# Altium PCB NB3000XN.PcbDoc (part 25 of 71)
Units mil, origin at the board's own origin, x right, y up, seen from the top; angles counter-clockwise.
Board outline 9527.56 x 6929.77 mil, 6 copper layers (Top Layer, GND+SHIELD, MidLayer1, MidLayer2, P2 - 3V3+5V0, Bottom Layer), stack 62.375 mil thick; 832 components, 1027 nets, 4655 pads, 4981 vias.
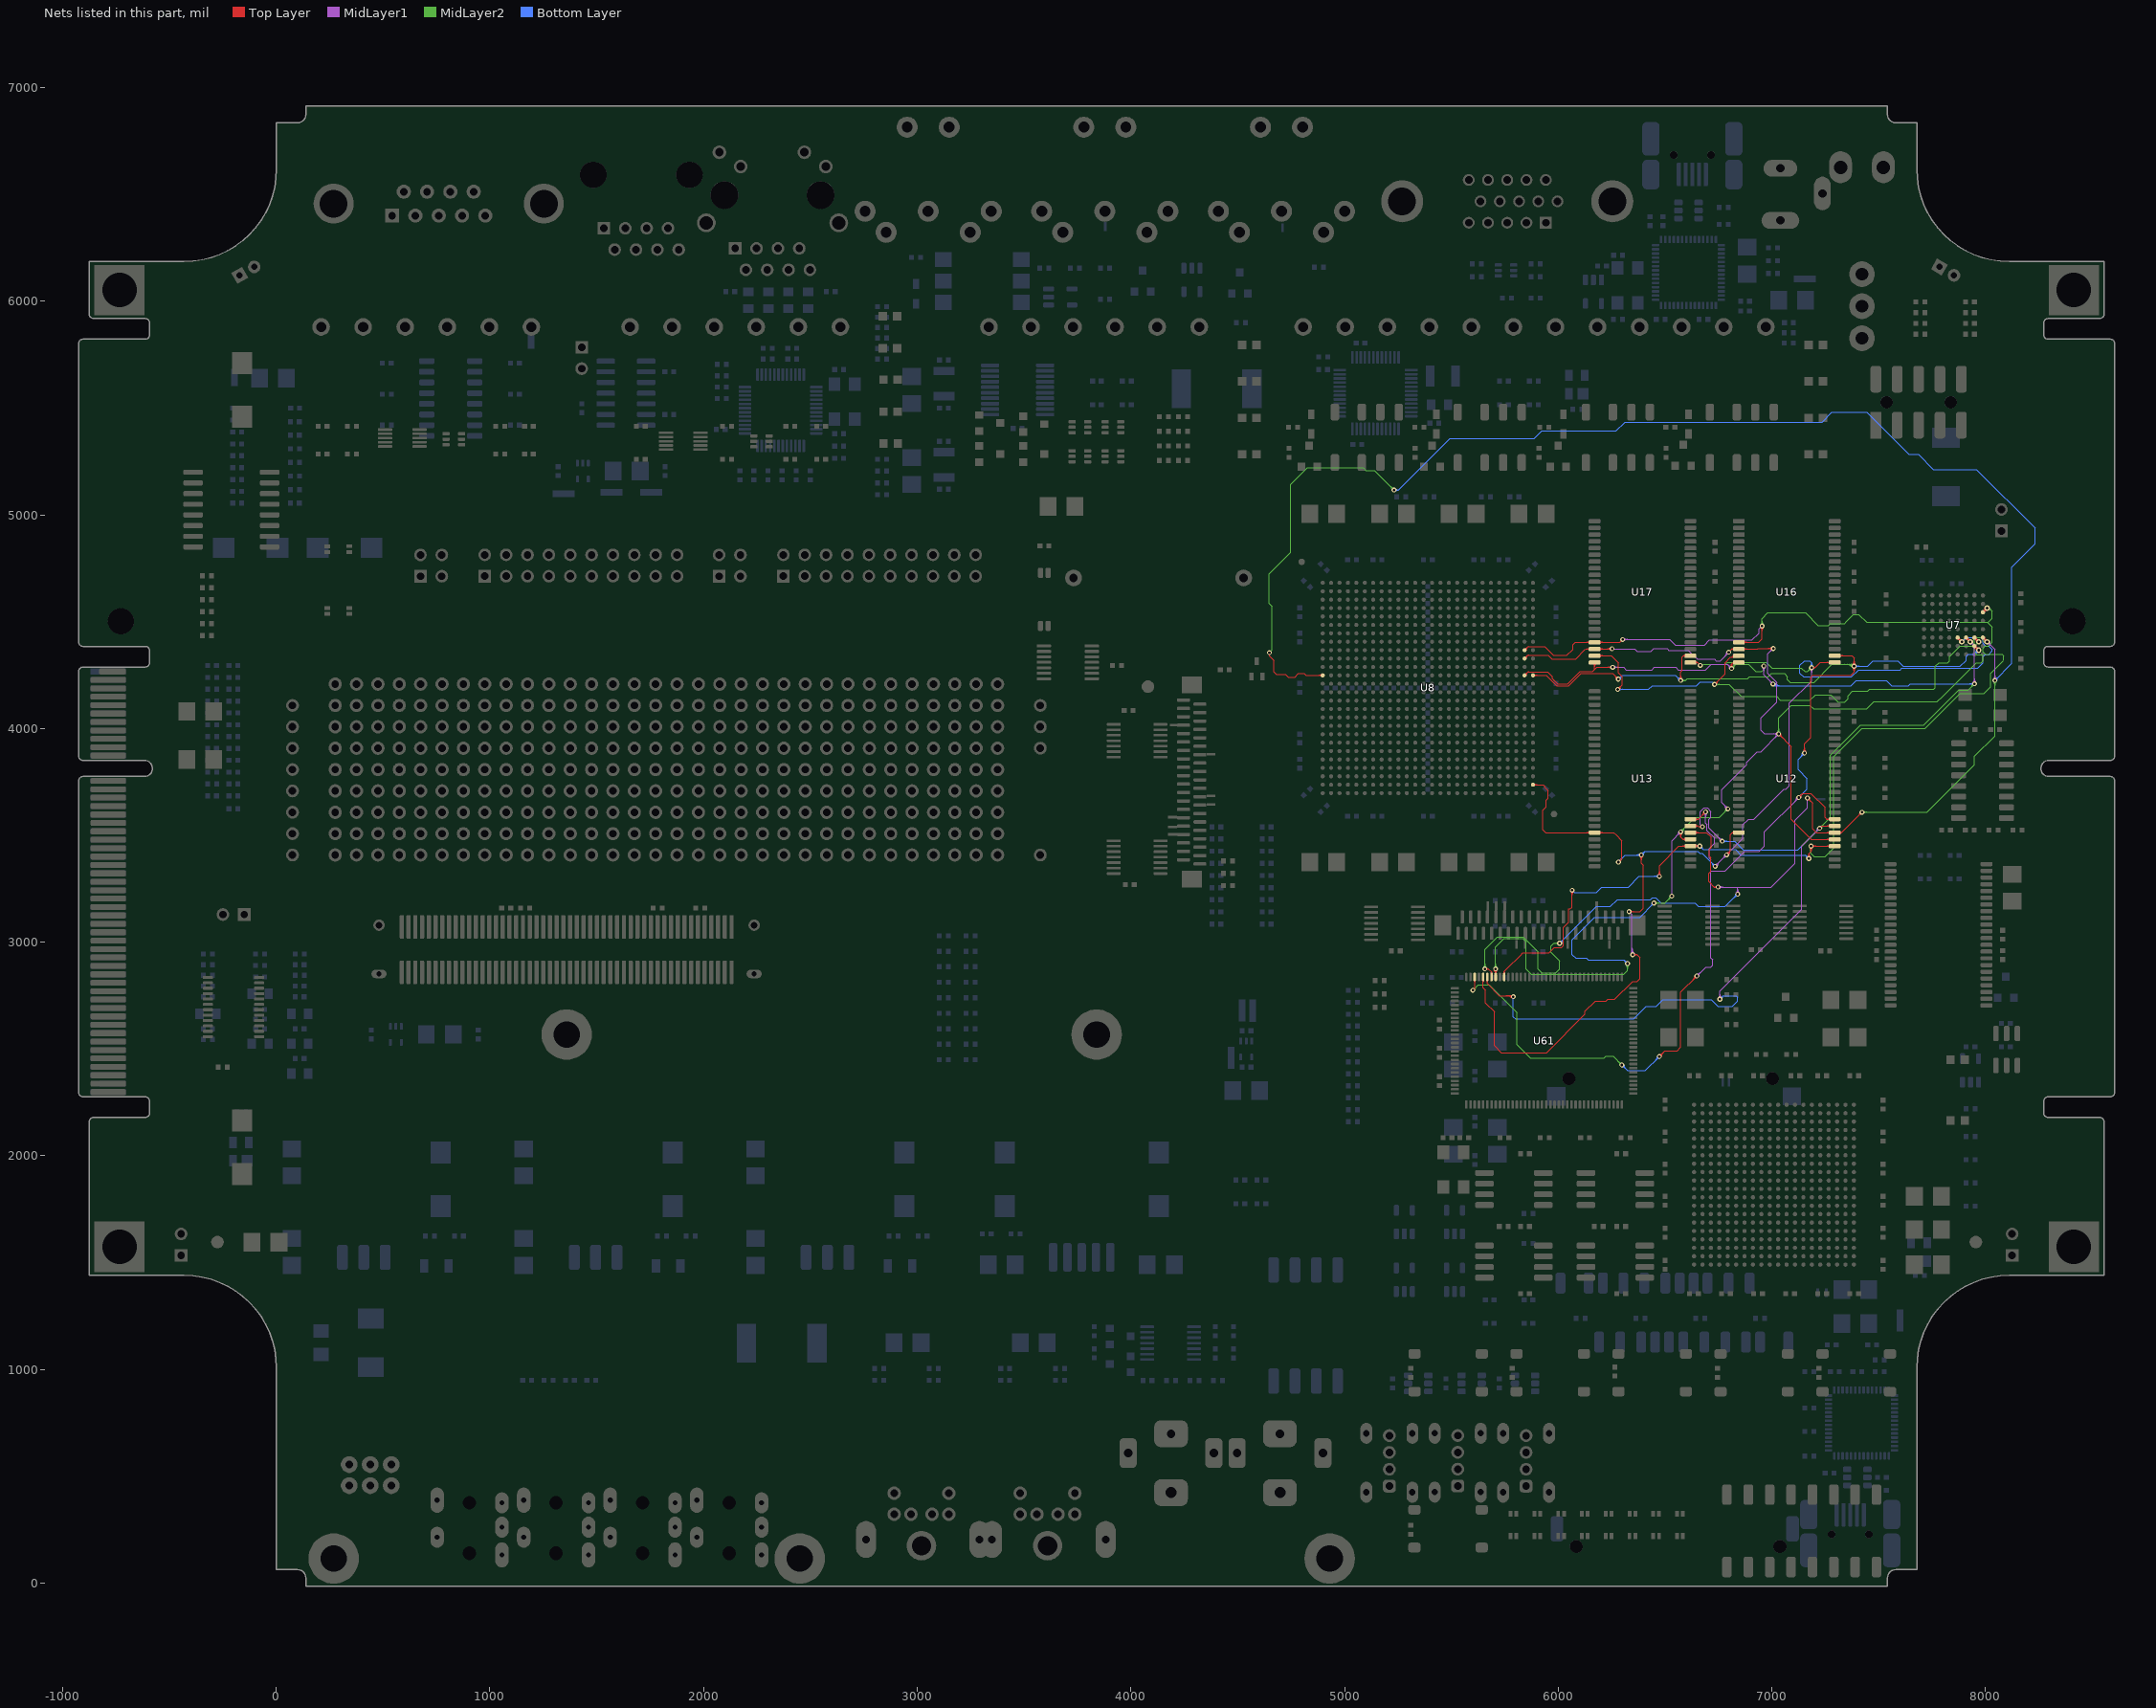
[diagram p29: the nets of this part, all layers, seen from the top]

## Via types
v1: diameter 23, hole 11.81, Top Layer to Bottom Layer, 3672 vias
v2: diameter 26, hole 11.81, Top Layer to Bottom Layer, 461 vias
v3: diameter 19, hole 11.81, Top Layer to Bottom Layer, tented both sides, 396 vias
v4: diameter 23.62, hole 11.81, Top Layer to Bottom Layer, 288 vias
v5: diameter 20, hole 11.81, Top Layer to Bottom Layer, 91 vias
v6: diameter 23, hole 11.81, Top Layer to Bottom Layer, tented both sides, 50 vias
v7: diameter 31, hole 11.81, Top Layer to Bottom Layer, 15 vias
v8: diameter 27.56, hole 11.81, Top Layer to Bottom Layer, tented both sides, 4 vias
v9: diameter 29, hole 11.81, Top Layer to Bottom Layer, 3 vias
v10: diameter 21, hole 11.81, Top Layer to Bottom Layer, 1 vias

## Nets (pads, with @x,y where several pads share a name; then routed paths per layer and width w, separated by ;. In a path a pad name is that pad's centre, name@x,y a point inside that pad or via, vN(x,y) a via of type N, cw(c..) or ccw(c..) an arc to the next point about the centre after c; other vN are vias at no path point) (continued)
DB_MEM.BUS_A8: U7.A3 U8.J25 U12.31 U13.31 U16.19 U17.19 U61.93 | length 7716.6
  Top Layer w4: U61.93@5744.34,2853.36 ccw(c5737.51,2860.19) 5747.17,2860.19 ccw(c5756.82,2860.19) U61.93@5749.99,2853.36 ; U61.93@5747.17,2837.34 5747.17,2862.68 5760.37,2875.89 5824.48,2940 5834.48,2950 5956.82,2950 5981.86,2975.04 6015.86,2975.04 6024.19,2983.37 6024.19,3070.04 6048.52,3094.37 6048.52,3154.04 6050.19,3155.71 6056.86,3155.71 6065.19,3164.04 v1(6065.19,3243.37) ; U8.J25@5842.76,4374.51 ccw(c5842.76,4392.23) 5855.29,4379.7 ; U8.J25@5850.1,4367.17 cw(c5867.83,4367.17) 5855.29,4379.7 ; v1@6058.47,3236.66 cw(c6042.26,3220.44) 6065.19,3220.44 cw(c6088.13,3220.44) v1@6071.91,3236.66 ; v1@6061.3,3239.49 cw(c6051.91,3230.1) 6065.19,3230.1 cw(c6078.47,3230.1) v1@6069.08,3239.49 ; U17.19@6147.37,4398.12 ccw(c6133.72,4384.47) 6133.72,4403.78 ccw(c6133.72,4423.09) U17.19@6147.37,4409.44 ; U17.19@6193.81,4398.12 cw(c6207.46,4384.47) 6207.46,4403.78 cw(c6207.46,4423.09) U17.19@6193.81,4409.44 ; v1(6301.86,4416.71) 6288.93,4403.78 U17.19@6170.59,4403.78 6080.86,4403.78 6068.86,4391.78 6068.86,4370.37 6041.19,4342.71 5976.52,4342.71 5936.56,4382.67 5924.74,4382.67 5920,4382.67 5910,4382.67 5862.47,4382.67 ccw(c5862.47,4372.52) 5855.29,4379.7 ; v1@6466.81,3315.09 ccw(c6450.59,3331.31) 6473.52,3331.31 ccw(c6496.46,3331.31) v1@6480.24,3315.09 ; v1@6469.64,3312.26 ccw(c6460.25,3321.65) 6473.52,3321.65 ccw(c6486.8,3321.65) v1@6477.41,3312.26 ; v1(6473.52,3308.37) 6473.52,3358.37 6565.19,3450.04 U13.31@6619.41,3450.04 ; U13.31@6596.19,3444.38 ccw(c6582.53,3430.72) 6582.53,3450.04 ccw(c6582.54,3469.35) U13.31@6596.19,3455.7 ; U13.31@6642.63,3444.38 cw(c6656.29,3430.72) 6656.29,3450.04 cw(c6656.28,3469.35) U13.31@6642.63,3455.7 ; v1@6656.14,3443.32 ccw(c6639.92,3427.11) 6639.92,3450.04 ccw(c6639.92,3472.98) v1@6656.14,3456.76 ; v1@6658.97,3446.15 ccw(c6649.58,3436.76) 6649.58,3450.04 ccw(c6649.58,3463.32) v1@6658.97,3453.93 ; v1(6662.86,3450.04) U13.31@6623.52,3450.04 ; U16.19@6845.59,4403.78 6938.78,4403.78 6954.52,4419.52 v1(6954.52,4480.04) ; U16.19@6868.81,4398.12 cw(c6882.46,4384.47) 6882.46,4403.78 cw(c6882.46,4423.09) U16.19@6868.81,4409.44 ; v1@6947.81,4473.32 cw(c6931.59,4457.11) 6954.52,4457.11 cw(c6977.46,4457.11) v1@6961.24,4473.32 ; v1@6950.64,4476.15 cw(c6941.25,4466.76) 6954.52,4466.76 cw(c6967.8,4466.76) v1@6958.41,4476.15 ; v1@7166.81,3398.43 ccw(c7150.59,3414.64) 7173.52,3414.64 ccw(c7196.46,3414.64) v1@7180.24,3398.43 ; v1@7169.64,3395.6 ccw(c7160.25,3404.99) 7173.52,3404.99 ccw(c7186.8,3404.99) v1@7177.41,3395.6 ; v1(7173.52,3391.71) 7173.52,3415 7183.52,3425 v1(7183.52,3450.04) U12.31@7276.86,3450.04 ; v1@7176.81,3443.32 cw(c7160.59,3427.11) 7183.52,3427.11 cw(c7206.46,3427.11) 7190.24,3443.32 cw(c7206.46,3427.11) 7206.46,3450.04 cw(c7206.46,3472.98) v1@7190.24,3456.76 ; v1@7179.64,3446.15 cw(c7170.25,3436.76) 7183.52,3436.76 cw(c7196.8,3436.76) 7187.41,3446.15 cw(c7196.8,3436.76) 7196.8,3450.04 cw(c7196.8,3463.32) v1@7187.41,3453.93 ; U12.31@7271.19,3444.38 ccw(c7257.53,3430.72) 7257.53,3450.04 ccw(c7257.54,3469.35) U12.31@7271.19,3455.7 ; U13.31@6619.41,3450.04 U13.31@6623.52,3450.04 ; U13.31@6619.41,3450.04 U13.31@6623.52,3450.04
  Top Layer w8: U7.A3@7987.8,4544.06 v2(8007.48,4563.74) ; U7.A3@7987.8,4550.06 ccw(c7987.8,4564.54) 7998.04,4554.3 ccw(c8008.28,4544.06) U7.A3@7993.8,4544.06 ; v2@7998.48,4563.74 cw(c7976.75,4563.74) 7992.12,4548.38 cw(c8007.48,4533.01) v2@8007.48,4554.74
  MidLayer1 w4: v1(6301.86,4416.71) 6522.51,4416.71 6548.01,4391.21 6684.75,4391.21 6707.75,4414.21 6907.5,4414.21 6940,4446.71 6940,4465.52 v1(6954.52,4480.04) ; v1@6305.75,4412.82 cw(c6315.14,4403.43) 6315.14,4416.71 cw(c6315.14,4429.99) v1@6305.75,4420.6 ; v1@6308.57,4409.99 cw(c6324.79,4393.77) 6324.79,4416.71 cw(c6324.79,4439.64) v1@6308.57,4423.43
  MidLayer2 w4: v1@6947.81,4486.76 ccw(c6931.59,4502.98) 6954.52,4502.98 ccw(c6977.46,4502.98) v1@6961.24,4486.76 ; v1@6950.64,4483.93 ccw(c6941.25,4493.32) 6954.52,4493.32 ccw(c6967.8,4493.32) v1@6958.41,4483.93 ; v1(6954.52,4480.04) 6954.52,4514.37 6981.86,4541.71 7156.86,4541.71 7215.52,4483.04 7265.88,4483.04 7274.88,4492.04 7340.52,4492.04 7348.52,4500.04 7381.86,4533.37 7406.86,4533.37 7443.19,4497.04 8012.19,4497.04 ; v1@7176.81,3443.32 cw(c7164.61,3431.13) 7181.86,3431.13 ; 7181.86,3423.08 cw(c7210.48,3423.08) v1@7190.24,3443.32 ; 7181.86,3432.74 cw(c7200.83,3432.74) v1@7187.41,3446.15 ; v1@7181.86,3448.37 7181.86,3416.71 7198.52,3400.04 7248.52,3400.04 7289.52,3441.04 7289.52,3868.41 7421.82,4000.71 7717.02,4000.71 7880.73,4164.42 7992.94,4164.42 8023.52,4195 8023.52,4258.37 8081.44,4316.29 ; v2@8007.28,4564.72 cw(c8010.41,4549.45) 8021.43,4560.47 ; v2(8007.48,4563.74) 8006.86,4563.74 8006.86,4566.71 8015.19,4566.71 8031.86,4550.04 8031.86,4516.71 8012.19,4497.04 ; v2@8008.08,4560.8 cw(c8012.19,4540.73) 8026.68,4555.22 ; v2@8008.88,4556.88 cw(c8013.98,4532) 8031.94,4549.96 ; 8081.44,4316.44 8085,4320 8085,4340 8077.29,4347.71 7999.19,4347.71 7988.19,4358.71 7988.19,4375.71 7998.52,4386.04 8014.19,4386.04 8031.86,4403.71 8031.86,4475.04 8011.02,4495.87 8012.19,4497.04
  Bottom Layer w4: v1(6065.19,3243.37) 6075.19,3233.37 6178.88,3233.37 6203.88,3258.37 6310,3258.37 6328.88,3258.37 6378.88,3308.37 v1(6473.52,3308.37) ; v1@6466.81,3301.66 ccw(c6450.59,3285.44) 6450.59,3308.37 ccw(c6450.59,3331.31) v1@6466.81,3315.09 ; v1@6469.64,3304.49 ccw(c6460.25,3295.1) 6460.25,3308.37 ccw(c6460.25,3321.65) v1@6469.64,3312.26 ; v1@6662.86,3440.54 cw(c6662.86,3417.61) 6679.08,3433.82 cw(c6695.29,3450.04) v1@6672.36,3450.04 ; v1@6662.86,3444.54 cw(c6662.86,3431.26) 6672.25,3440.65 cw(c6681.64,3450.04) v1@6668.36,3450.04 ; v1(6662.86,3450.04) 6679.52,3433.37 6831.25,3433.37 6856.25,3408.37 7156.86,3408.37 v1(7173.52,3391.71) ; v1@7164.02,3391.71 ccw(c7141.09,3391.71) 7157.31,3407.93 ccw(c7173.52,3424.14) v1@7173.52,3401.21 ; v1@7168.02,3391.71 ccw(c7154.75,3391.71) 7164.14,3401.1 ccw(c7173.52,3410.49) v1@7173.52,3397.21
DB_MEM.BUS_A9: U7.B6 U8.K25 U12.32 U13.32 U16.20 U17.20 U61.95 | length 8228
  Top Layer w4: v1@5700.14,2868.32 cw(c5681.66,2849.84) U61.95@5707.8,2849.84 ; v1@5702.97,2871.15 cw(c5691.31,2859.5) 5707.79,2859.5 ; U61.95@5704.97,2853.36 ccw(c5698.14,2860.19) 5707.8,2860.19 ccw(c5717.45,2860.19) U61.95@5710.62,2853.36 ; v1(5706.86,2875.04) 5707.79,2874.1 U61.95@5707.79,2837.34 ; U61.95@5707.8,2854.37 cw(c5727.53,2854.37) v1@5713.57,2868.32 ; 6002,4325 5971.6,4325 5971.56,4325.04 ; U17.20@6147.37,4366.63 ccw(c6133.72,4352.97) 6133.72,4372.28 ccw(c6133.72,4391.6) U17.20@6147.37,4377.94 ; U17.20@6193.81,4366.63 cw(c6207.46,4352.97) 6207.46,4372.28 cw(c6207.46,4391.6) U17.20@6193.81,4377.94 ; v1@6245.81,4366.66 ccw(c6229.59,4350.44) 6229.59,4373.37 ccw(c6229.59,4396.31) v1@6245.81,4380.09 ; v1@6248.64,4369.49 ccw(c6239.25,4360.1) 6239.25,4373.37 ccw(c6239.25,4386.65) v1@6248.64,4377.26 ; v1(6252.52,4373.37) 6222.52,4373.37 6221.43,4372.28 U17.20@6170.59,4372.28 6129.1,4372.28 ; v1@6566.81,3509.99 cw(c6550.59,3493.77) 6573.52,3493.77 cw(c6596.46,3493.77) v1@6580.24,3509.99 ; v1@6569.64,3512.82 cw(c6560.25,3503.43) 6573.52,3503.43 cw(c6586.8,3503.43) v1@6577.41,3512.82 ; v1(6573.52,3516.71) 6573.52,3491.71 6583.7,3481.53 ; U13.32@6595.95,3476.14 ccw(c6583.7,3464.94) 6583.7,3481.53 ; U13.32@6595.95,3486.93 cw(c6583.7,3498.13) 6583.7,3481.53 ; U13.32@6619.41,3481.54 6583.7,3481.53 ; v1(6798.52,4357.37) 6798.52,4358.04 6812.77,4372.28 ; U16.20@6821.45,4367.73 ccw(c6812.77,4361.72) 6812.77,4372.28 ; U16.20@6821.45,4376.84 cw(c6812.77,4382.85) 6812.77,4372.28 ; U16.20@6868.81,4366.63 cw(c6882.46,4352.97) 6882.46,4372.28 cw(c6882.46,4391.6) U16.20@6868.81,4377.94 ; v1@7000.14,4368.32 ccw(c6983.92,4352.11) 6983.92,4375.04 ccw(c6983.92,4397.98) v1@7000.14,4381.76 ; v1@7002.97,4371.15 ccw(c6993.58,4361.76) 6993.58,4375.04 ccw(c6993.58,4388.32) v1@7002.97,4378.93 ; v1(7006.86,4375.04) 6935.52,4375.04 6932.77,4372.28 U16.20@6845.59,4372.28 6812.77,4372.28 ; v1@7031.86,3965.54 cw(c7031.86,3942.61) 7048.07,3958.82 cw(c7064.29,3975.04) v1@7041.36,3975.04 ; v1@7031.86,3969.54 cw(c7031.86,3956.26) 7041.25,3965.65 cw(c7050.64,3975.04) v1@7037.36,3975.04 ; v1(7031.86,3975.04) 7090.19,3916.71 7090.19,3575.04 7183.7,3481.53 U12.32@7294.41,3481.54 ; U12.32@7271.19,3475.88 ccw(c7257.54,3462.22) 7257.54,3481.53 ccw(c7257.54,3500.85) U12.32@7271.19,3487.19 ; 5855.29,4340.33 cw(c5862.47,4333.15) 5862.47,4343.3 ; 5855.29,4340.33 cw(c5862.47,4333.15) 5862.47,4343.3 ; 5855.29,4340.33 cw(c5842.76,4352.86) 5842.76,4335.14 ccw(c5842.76,4352.86) 5855.29,4340.33 ; 5855.29,4340.33 ccw(c5867.83,4327.8) 5850.1,4327.8 cw(c5867.83,4327.8) 5855.29,4340.33 ; 5862.47,4343.3 5910,4343.3 5920,4343.3 ; 5920,4343.3 5924.74,4343.3 5925.06,4343.3 ; 5920,4343.3 5925.06,4343.3 ; 5925.06,4343.3 5928.74,4343.3 ; 5925.06,4343.3 5928.74,4343.31 ; 5928.74,4343.3 5943,4343.3 5949.72,4343.3 5953.3,4343.3 5971.56,4325.04 ; 5971.56,4325.04 6081.86,4325.04 6126.01,4369.19 ; 6126.01,4369.19 6129.1,4372.28 ; 6126.01,4369.19 6129.1,4372.28
  Top Layer w8: U7.B6@7948.43,4419.94 cw(c7948.43,4405.46) 7958.67,4415.7 cw(c7968.91,4425.94) U7.B6@7954.43,4425.94 ; U7.B6@7948.43,4425.94 v2(7968.11,4406.26) ; v2@7959.11,4406.26 ccw(c7937.38,4406.26) 7952.75,4421.62 ccw(c7968.11,4436.99) v2@7968.11,4415.26
  MidLayer1 w4: v1(6252.52,4373.37) 6358.21,4373.37 6369.21,4362.37 6435.17,4362.37 6447.84,4375.04 6509.84,4375.04 6518.17,4366.71 6609.61,4366.71 6651.27,4325.04 6731.27,4325.04 6738.94,4317.37 6758.52,4317.37 v1(6798.52,4357.37) ; v1(6531.86,3215.71) 6531.86,3475.04 v1(6573.52,3516.71) ; v1@6564.02,3516.71 cw(c6541.09,3516.71) 6557.31,3500.49 cw(c6573.52,3484.27) v1@6573.52,3507.21 ; v1@6568.02,3516.71 cw(c6554.75,3516.71) 6564.14,3507.32 cw(c6573.52,3497.93) v1@6573.52,3511.21 ; v1@6785.02,3624.04 ccw(c6762.09,3624.04) 6778.31,3640.26 ccw(c6794.52,3656.48) v1@6794.52,3633.54 ; v1@6789.02,3624.04 ccw(c6775.75,3624.04) 6785.14,3633.43 ccw(c6794.52,3642.82) v1@6794.52,3629.54 ; v1@6789.02,4357.37 cw(c6766.09,4357.37) 6782.31,4341.16 cw(c6798.52,4324.94) v1@6798.52,4347.87 ; v1@6793.02,4357.37 cw(c6779.75,4357.37) 6789.14,4347.99 cw(c6798.52,4338.6) v1@6798.52,4351.87 ; v1(6794.52,3624.04) 6765.19,3653.37 6765.19,3714.71 6881.86,3831.37 6881.86,3841.71 6931.86,3891.71 6948.52,3891.71 v1(7031.86,3975.04) 6965.19,3975.04 6948.52,3991.71 6948.52,4049.37 7023.52,4124.37 7023.52,4216.37 6981.86,4258.04 6981.86,4350.04 v1(7006.86,4375.04) ; v1@6997.36,4375.04 cw(c6974.42,4375.04) 6990.64,4358.82 cw(c7006.86,4342.61) v1@7006.86,4365.54 ; v1@7001.36,4375.04 cw(c6988.08,4375.04) 6997.47,4365.65 cw(c7006.86,4356.26) v1@7006.86,4369.54 ; v1@7022.36,3975.04 cw(c6999.42,3975.04) 7015.64,3958.82 cw(c7031.86,3942.61) v1@7031.86,3965.54 ; v1@7025.14,3968.32 ccw(c7008.92,3952.11) 7008.92,3975.04 ccw(c7008.92,3997.98) v1@7025.14,3981.76 ; v1@7026.36,3975.04 cw(c7013.08,3975.04) 7022.47,3965.65 cw(c7031.86,3956.26) v1@7031.86,3969.54 ; v1@7027.97,3971.15 ccw(c7018.58,3961.76) 7018.58,3975.04 ccw(c7018.58,3988.32) v1@7027.97,3978.93
  MidLayer2 w4: v1@5700.14,2881.76 ccw(c5683.92,2897.98) 5706.86,2897.98 ccw(c5729.79,2897.98) v1@5713.57,2881.76 ; v1@5702.97,2878.93 ccw(c5693.58,2888.32) 5706.86,2888.32 ccw(c5720.14,2888.32) v1@5710.75,2878.93 ; v1(5706.86,2875.04) 5706.86,2977.71 5745.86,3016.71 5834.23,3016.71 5850,3000.94 5850,2873.56 5874.19,2849.37 6306.56,2849.37 6324.52,2867.34 v1(6324.52,2900.04) ; v1@6317.81,2893.32 cw(c6301.59,2877.11) 6324.52,2877.11 cw(c6347.46,2877.11) v1@6331.24,2893.32 ; v1@6320.64,2896.15 cw(c6311.25,2886.76) 6324.52,2886.76 cw(c6337.8,2886.76) v1@6328.41,2896.15 ; v1(6448.52,3183.37) 6499.52,3183.37 v1(6531.86,3215.71) ; v1@6452.41,3179.49 cw(c6461.8,3170.1) 6461.8,3183.37 cw(c6461.8,3196.65) v1@6452.41,3187.26 ; v1@6455.24,3176.66 cw(c6471.46,3160.44) 6471.46,3183.37 cw(c6471.46,3206.31) v1@6455.24,3190.09 ; v1@6522.36,3215.71 cw(c6499.42,3215.71) 6515.64,3199.49 cw(c6531.86,3183.27) v1@6531.86,3206.21 ; v1@6526.36,3215.71 cw(c6513.08,3215.71) 6522.47,3206.32 cw(c6531.86,3196.93) v1@6531.86,3210.21 ; v1(6573.52,3516.71) 6640.19,3583.37 6753.86,3583.37 v1(6794.52,3624.04) ; v1@6573.52,3522.21 ccw(c6573.52,3535.49) 6582.91,3526.1 ccw(c6592.3,3516.71) v1@6579.02,3516.71 ; v1@6573.52,3526.21 ccw(c6573.52,3549.14) 6589.74,3532.93 ccw(c6605.96,3516.71) v1@6583.02,3516.71 ; v1@6785.02,3624.04 cw(c6762.09,3624.04) 6778.31,3607.82 cw(c6794.52,3591.61) v1@6794.52,3614.54 ; v1@6789.02,3624.04 cw(c6775.75,3624.04) 6785.13,3614.65 cw(c6794.52,3605.26) v1@6794.52,3618.54 ; v1@7025.14,3981.76 ccw(c7008.92,3997.98) 7031.86,3997.98 ccw(c7054.79,3997.98) v1@7038.57,3981.76 ; v1@7027.97,3978.93 ccw(c7018.58,3988.32) 7031.86,3988.32 ccw(c7045.14,3988.32) v1@7035.75,3978.93 ; v1(7031.86,3975.04) 7031.86,4050.04 7090.19,4108.37 7178.88,4108.37 7195.21,4092.04 7443.5,4092.04 7476.84,4125.37 7773.86,4125.37 7799.76,4151.28 7956.86,4308.37 7979.52,4308.37 7987.86,4316.71 7987.86,4345.04 7986.19,4346.71 7957.86,4346.71 7948.52,4356.04 7948.52,4386.67 v2(7968.11,4406.26)
  Bottom Layer w4: v1@6315.02,2900.04 ccw(c6292.09,2900.04) 6308.31,2916.26 ccw(c6324.52,2932.48) v1@6324.52,2909.54 ; v1@6319.02,2900.04 ccw(c6305.75,2900.04) 6315.14,2909.43 ccw(c6324.52,2918.82) v1@6324.52,2905.54 ; v1(6324.52,2900.04) 6306.86,2917.71 6165.19,2917.71 6164.19,2916.71 6140.19,2916.71 6131.86,2925.04 6081.86,2925.04 6065.19,2941.71 6065.19,3011.04 6170.86,3116.71 6381.86,3116.71 v1(6448.52,3183.37) ; v1@6439.02,3183.37 cw(c6416.09,3183.37) 6432.31,3167.16 cw(c6448.52,3150.94) v1@6448.52,3173.87 ; v1@6443.02,3183.37 cw(c6429.75,3183.37) 6439.14,3173.99 cw(c6448.52,3164.6) v1@6448.52,3177.87
DB_MEM.BUS_A10: U7.A6 U8.M1 U12.33 U13.33 U16.21 U17.21 U61.96 | length 14451.3
  Top Layer w4: v1(4648.52,4355.04) 4648.52,4339.71 4670.52,4317.71 4670.52,4264.37 4681.86,4253.04 4723.52,4253.04 4735.86,4240.71 4767.17,4240.71 4784.34,4257.87 4811.11,4257.87 4819.93,4249.05 4856.86,4249.05 ; 4855.26,4249.06 4860,4249.06 4870,4249.06 U8.M1@4897.87,4249.06 ; U8.M1@4892.57,4243.75 ccw(c4879.77,4230.95) 4879.77,4249.06 ccw(c4879.77,4267.16) U8.M1@4892.57,4254.36 ; U8.M1@4892.68,4243.86 ccw(c4880.15,4231.33) 4880.15,4249.06 ccw(c4880.15,4266.78) U8.M1@4892.68,4254.25 ; v1(5656.86,2875.04) 5673.52,2875.04 ; v1@5665.03,2870.2 cw(c5673.52,2865.17) 5673.52,2875.04 ; v1@5665.03,2879.88 ccw(c5673.52,2884.91) 5673.52,2875.04 ; U61.96@5685.28,2853.36 ccw(c5678.45,2860.19) 5688.11,2860.19 ccw(c5697.77,2860.19) U61.96@5690.94,2853.36 ; U61.96@5688.11,2837.34 5688.11,2860.45 5673.52,2875.04 ; U17.21@6170.59,4340.79 6249.44,4340.79 6281.86,4308.37 6281.86,4261.04 6299.86,4243.04 6299.86,4204.71 v1(6278.52,4183.37) ; U17.21@6193.81,4335.13 cw(c6207.46,4321.47) 6207.46,4340.79 cw(c6207.46,4360.1) U17.21@6193.81,4346.44 ; v1@6278.52,4188.87 ccw(c6278.52,4202.15) 6287.91,4192.76 ccw(c6297.3,4183.37) v1@6284.02,4183.37 ; v1@6278.52,4192.87 ccw(c6278.52,4215.81) 6294.74,4199.59 ccw(c6310.96,4183.37) v1@6288.02,4183.37 ; U13.33@6619.41,3513.03 6695.2,3513.03 6716.52,3491.71 6716.52,3443.04 6706.86,3433.37 6706.86,3403.69 6715.19,3395.35 6715.19,3331.35 6705,3321.16 6705,3283.37 6730,3258.37 ; U13.33@6642.63,3507.37 cw(c6656.28,3493.72) 6656.28,3513.03 cw(c6656.28,3532.35) U13.33@6642.63,3518.69 ; v1(6731.86,4206.71) 6781.86,4256.71 6781.86,4308.37 6806.86,4333.37 ; v1@6731.86,4212.21 ccw(c6731.86,4225.49) 6741.25,4216.1 ccw(c6750.64,4206.71) v1@6737.36,4206.71 ; v1@6731.86,4216.21 ccw(c6731.86,4239.14) 6748.07,4222.93 ccw(c6764.29,4206.71) v1@6741.36,4206.71 ; v1@6740.81,3252.83 ccw(c6730,3245.07) 6730,3258.37 ; v1@6740.81,3263.92 cw(c6730,3271.68) 6730,3258.37 ; v1(6748.52,3258.37) 6730,3258.37 ; 6812.35,4333.37 ccw(c6812.35,4345.85) U16.21@6824.23,4342.02 ; 6817.85,4333.37 ccw(c6817.85,4344.08) U16.21@6828.03,4340.79 ; U16.21@6820.42,4343.25 cw(c6806.86,4347.62) 6806.86,4333.37 ; U16.21@6845.59,4340.79 6848.52,4340.79 6848.52,4333.37 6845.59,4333.37 6806.86,4333.37 ; v1@7166.52,3665.54 cw(c7166.52,3642.61) 7182.74,3658.82 cw(c7198.96,3675.04) v1@7176.02,3675.04 ; v1@7166.52,3669.54 cw(c7166.52,3656.26) 7175.91,3665.65 cw(c7185.3,3675.04) v1@7172.02,3675.04 ; v1(7166.52,3675.04) 7190.19,3651.37 7190.19,3529.7 7206.86,3513.03 7326.51,3513.03 ; U12.33@7271.19,3507.37 ccw(c7257.54,3493.72) 7257.54,3513.03 ccw(c7257.54,3532.35) U12.33@7271.19,3518.69 ; U12.33@7318.72,3508.75 cw(c7326.51,3503.81) 7326.51,3513.03 ; U12.33@7318.73,3517.31 ccw(c7326.51,3522.25) 7326.51,3513.03 ; v1@7412.36,3608.37 cw(c7389.42,3608.37) 7405.64,3592.16 cw(c7421.86,3575.94) v1@7421.86,3598.87 ; v1@7416.36,3608.37 cw(c7403.08,3608.37) 7412.47,3598.99 cw(c7421.86,3589.6) v1@7421.86,3602.87 ; v1(7421.86,3608.37) 7326.51,3513.03
  Top Layer w8: U7.A6@7987.8,4419.94 cw(c7987.8,4405.46) 7998.04,4415.7 cw(c8008.28,4425.94) U7.A6@7993.8,4425.94 ; U7.A6@7987.8,4425.94 v2(8007.48,4406.26) ; v2@7998.48,4406.26 ccw(c7976.75,4406.26) 7992.12,4421.62 ccw(c8007.48,4436.99) v2@8007.48,4415.26
  MidLayer1 w4: v1(6748.52,3258.37) 6840.19,3258.37 ; v1@6752.41,3254.49 cw(c6761.8,3245.1) 6761.8,3258.37 cw(c6761.8,3271.65) v1@6752.41,3262.26 ; v1@6755.24,3251.66 cw(c6771.46,3235.44) 6771.46,3258.37 cw(c6771.46,3281.31) v1@6755.24,3265.09 ; v1@6833.47,3231.76 ccw(c6817.26,3247.98) 6840.19,3247.98 ccw(c6863.13,3247.98) v1@6846.91,3231.76 ; v1@6836.3,3228.93 ccw(c6826.91,3238.32) 6840.19,3238.32 ccw(c6853.47,3238.32) v1@6844.08,3228.93 ; v1(6840.19,3225.04) 6840.19,3258.37 ; v1(7166.52,3675.04) 7166.52,3629.36 7107.52,3570.36 7107.52,3370.35 6995.54,3258.37 6840.19,3258.37 ; v2@8007.48,4395.26 cw(c8007.48,4368.7) 8026.26,4387.48 cw(c8045.04,4406.26) v2@8018.48,4406.26 ; v2@8007.48,4399.26 cw(c8007.48,4382.36) 8019.43,4394.31 cw(c8031.38,4406.26) v2@8014.48,4406.26 ; v2(8007.48,4406.26) 8043.86,4369.88 v1(8043.86,4225.04) ; v1@8037.14,4231.76 ccw(c8020.92,4247.98) 8043.86,4247.98 ccw(c8066.79,4247.98) v1@8050.57,4231.76 ; v1@8039.97,4228.93 ccw(c8030.58,4238.32) 8043.86,4238.32 ccw(c8057.14,4238.32) v1@8047.75,4228.93
  MidLayer2 w4: v1(4648.52,4355.04) 4661.19,4367.71 4661.19,4572.04 4648.19,4585.04 4648.19,4724.71 4685.26,4761.78 4748.52,4825.04 4748.52,5143.69 4826.03,5221.19 5088,5221.19 5100.65,5208.54 5140.02,5208.54 v1(5231.86,5116.71) ; v1@5222.36,5116.71 ccw(c5199.42,5116.71) 5215.64,5132.93 ccw(c5231.86,5149.14) v1@5231.86,5126.21 ; v1@5226.36,5116.71 ccw(c5213.08,5116.71) 5222.47,5126.1 ccw(c5231.86,5135.49) v1@5231.86,5122.21 ; v1@5650.14,2881.76 ccw(c5633.92,2897.98) 5656.86,2897.98 ccw(c5679.79,2897.98) v1@5663.57,2881.76 ; v1@5652.97,2878.93 ccw(c5643.58,2888.32) 5656.86,2888.32 ccw(c5670.14,2888.32) v1@5660.75,2878.93 ; v1(5656.86,2875.04) 5656.86,2966.71 5715.19,3025.04 5837.21,3025.04 5906.86,2955.39 5906.86,2875.04 5924.52,2857.37 5989.19,2857.37 6006.86,2875.04 6006.86,2912.04 5966.86,2952.04 5966.86,2981.86 5980.04,2995.04 v1(6006.52,2995.04) ; v1@5999.81,2988.32 ccw(c5983.59,2972.11) 5983.59,2995.04 ccw(c5983.59,3017.98) v1@5999.81,3001.76 ; v1@6002.64,2991.15 ccw(c5993.25,2981.76) 5993.25,2995.04 ccw(c5993.25,3008.32) v1@6002.64,2998.93 ; v1(6731.86,4206.71) 6800.19,4206.71 6856.86,4150.04 7022.52,4150.04 7039.19,4133.37 7178.88,4133.37 7203.88,4158.37 7276.5,4158.37 7309.84,4125.04 7341.19,4125.04 7356.86,4140.71 7356.86,4153.37 7377.86,4174.37 7447.86,4174.37 7456.86,4183.37 7756.86,4183.37 7765.19,4191.71 7765.19,4291.71 7781.86,4308.37 7823.52,4308.37 7831.86,4316.71 7831.86,4336.71 7881.19,4386.04 7935.86,4386.04 7948.52,4398.71 7948.52,4414.04 7960.52,4426.04 7981.86,4426.04 7993.52,4414.37 7993.52,4406.25 v2(8007.48,4406.26) ; v1@6735.75,4202.82 cw(c6745.14,4193.43) 6745.14,4206.71 cw(c6745.14,4219.99) v1@6735.75,4210.6 ; v1@6738.57,4199.99 cw(c6754.79,4183.77) 6754.79,4206.71 cw(c6754.79,4229.64) v1@6738.57,4213.43 ; v1(7421.86,3608.37) 7725.9,3608.37 7948.52,3831 7948.52,3870.02 8043.86,3965.35 v1(8043.86,4225.04) ; v1@7425.75,3604.49 cw(c7435.14,3595.1) 7435.14,3608.37 cw(c7435.14,3621.65) v1@7425.75,3612.26 ; v1@7428.57,3601.66 cw(c7444.79,3585.44) 7444.79,3608.37 cw(c7444.79,3631.31) v1@7428.57,3615.09 ; v1@8037.14,4218.32 cw(c8020.92,4202.11) 8043.86,4202.11 cw(c8066.79,4202.11) v1@8050.57,4218.32 ; v1@8039.97,4221.15 cw(c8030.58,4211.76) 8043.86,4211.76 cw(c8057.14,4211.76) v1@8047.75,4221.15
  Bottom Layer w4: v1(5231.86,5116.71) 5251.71,5116.71 ; v1@5239.26,5110.75 cw(c5251.71,5100.72) 5251.71,5116.71 ; v1@5239.26,5122.67 ccw(c5251.71,5132.7) 5251.71,5116.71 ; v1(6006.52,2995.04) 6178.19,3166.71 6243.17,3166.71 6276.5,3200.04 6431.86,3200.04 6440.19,3208.37 6456.86,3208.37 6481.86,3183.37 6640.19,3183.37 6656.86,3166.71 6781.86,3166.71 v1(6840.19,3225.04) ; v1@6006.52,3000.54 ccw(c6006.52,3013.82) 6015.91,3004.43 ccw(c6025.3,2995.04) v1@6012.02,2995.04 ; v1@6006.52,3004.54 ccw(c6006.52,3027.48) 6022.74,3011.26 ccw(c6038.96,2995.04) v1@6016.02,2995.04 ; v1(6278.52,4183.37) 6423.37,4183.37 6440.04,4200.04 6647.19,4200.04 6665.19,4218.04 6720.52,4218.04 v1(6731.86,4206.71) ; v1@6282.41,4179.49 cw(c6291.8,4170.1) 6291.8,4183.37 cw(c6291.8,4196.65) v1@6282.41,4187.26 ; v1@6285.24,4176.66 cw(c6301.46,4160.44) 6301.46,4183.37 cw(c6301.46,4206.31) v1@6285.24,4190.09 ; v1@6830.69,3225.04 cw(c6807.76,3225.04) 6823.97,3208.82 cw(c6840.19,3192.61) v1@6840.19,3215.54 ; v1@6834.69,3225.04 cw(c6821.41,3225.04) 6830.8,3215.65 cw(c6840.19,3206.26) v1@6840.19,3219.54 ; v1(8043.86,4225.04) 8123.86,4305.04 8123.86,4756.48 8231.86,4864.48 8231.86,4938.12 7956.86,5213.12 7755.57,5213.12 7685.31,5283.37 7641.63,5283.37 7445,5480 7280,5480 7235,5435 6313.25,5435 6271.63,5393.37 5922.82,5393.37 5887.82,5358.37 5493.37,5358.37 5251.71,5116.71 ; v1@8043.86,4230.54 ccw(c8043.86,4243.82) 8053.25,4234.43 ccw(c8062.64,4225.04) v1@8049.36,4225.04 ; v1@8043.86,4234.54 ccw(c8043.86,4257.48) 8060.07,4241.26 ccw(c8076.29,4225.04) v1@8053.36,4225.04
DB_MEM.BUS_A11: U7.C6 U8.M25 U12.34 U13.34 U16.22 U17.22 U61.97 | length 8754.7
  Top Layer w4: U61.97@5665.6,2821.32 cw(c5658.77,2814.49) 5668.43,2814.49 cw(c5678.08,2814.49) U61.97@5671.25,2821.32 ; U61.97@5668.42,2837.34 5668.42,2806.57 5724.96,2750.04 5785.15,2750.04 v1(5790.19,2745) ; 5755.09,2750.04 cw(c5755.09,2709.9) v1@5783.47,2738.28 ; 5764.74,2750.04 cw(c5764.74,2719.55) v1@5786.3,2741.11 ; 5774.4,2750.04 cw(c5774.4,2729.21) v1@5789.13,2743.94 ; 5779.42,2750.04 ccw(c5779.42,2755.77) v1@5783.47,2751.72 ; U8.M25@5842.76,4256.4 ccw(c5842.76,4274.12) 5855.29,4261.59 ; U8.M25@5850.1,4249.06 cw(c5867.83,4249.06) 5855.29,4261.59 ; U17.22@6164.93,4303.64 cw(c6151.28,4289.98) 6170.59,4289.98 cw(c6189.9,4289.98) U17.22@6176.25,4303.64 ; U17.22@6170.59,4309.29 6170.59,4275.71 ; v1@6248.47,4279.99 ccw(c6232.26,4263.77) 6232.26,4286.71 ccw(c6232.26,4309.64) v1@6248.47,4293.43 ; v1@6251.3,4282.82 ccw(c6241.91,4273.43) 6241.91,4286.71 ccw(c6241.91,4299.99) v1@6251.3,4290.6 ; v1(6255.19,4286.71) 6181.59,4286.71 6170.59,4275.71 ; U13.34@6619.41,3544.53 6653.71,3544.53 ; U13.34@6643.19,3539.5 cw(c6653.7,3531.02) 6653.7,3544.53 ; U13.34@6643.19,3549.55 ccw(c6653.7,3558.03) 6653.7,3544.53 ; v1@6666.85,3535.6 ccw(c6657.52,3529.65) 6657.52,3540.71 ; v1@6666.85,3545.82 cw(c6657.52,3551.77) 6657.52,3540.71 ; v1(6674.86,3540.71) 6657.52,3540.71 ; v1@6805.55,4288.76 ccw(c6795.4,4301.29) 6811.52,4301.29 ; v1@6808.06,4285.65 ccw(c6802.19,4292.9) 6811.52,4292.9 ccw(c6820.86,4292.9) v1@6814.99,4285.65 ; v1(6811.52,4281.37) 6811.52,4301.29 ; 6811.98,4301.75 cw(c6822.52,4291.21) U16.22@6826.86,4305.47 ; 6816.69,4306.46 cw(c6824.72,4298.43) U16.22@6828.03,4309.29 ; v1@6817.5,4288.76 cw(c6827.65,4301.29) 6811.52,4301.29 ; U16.22@6845.59,4309.29 6819.52,4309.29 6811.52,4301.29 ; v1(7223.52,3533.37) 7234.68,3544.53 U12.34@7294.41,3544.53 ; U12.34@7271.19,3538.87 ccw(c7257.54,3525.22) 7257.54,3544.53 ccw(c7257.54,3563.84) U12.34@7271.19,3550.18 ; 5855.29,4261.59 cw(c5862.47,4254.41) 5862.47,4264.56 5910,4264.56 5920,4264.56 5924.74,4264.56 5951.67,4264.56 5973.52,4242.71 5973.52,4233.37 5998.52,4208.37 6045.54,4208.37 6103.88,4266.71 6161.59,4266.71 6170.59,4275.71 ; 6653.71,3544.53 6657.52,3540.71
  Top Layer w8: U7.C6@7909.06,4419.94 cw(c7909.06,4405.46) 7919.3,4415.7 cw(c7929.54,4425.94) U7.C6@7915.06,4425.94 ; U7.C6@7909.06,4425.94 v2(7928.74,4406.26) ; v2@7919.74,4406.26 ccw(c7898.01,4406.26) 7913.38,4421.62 ccw(c7928.74,4436.99) v2@7928.74,4415.26
  MidLayer1 w4: v1@6258.52,4283.37 v1(6255.19,4286.71) 6306.67,4286.71 6318.67,4274.71 6438.39,4274.71 6450.22,4286.54 6551.32,4286.54 6562.82,4275.04 6690.19,4275.04 6716.52,4301.37 6791.52,4301.37 v1(6811.52,4281.37) ; v1@6259.08,4282.82 cw(c6268.47,4273.43) 6268.47,4286.71 cw(c6268.47,4299.99) v1@6259.08,4290.6 ; v1@6261.91,4279.99 cw(c6278.13,4263.77) 6278.13,4286.71 cw(c6278.13,4309.64) v1@6261.91,4293.43 ; v1(6674.86,3540.71) 6665.19,3550.37 6665.19,3611.37 6681.86,3628.04 6698.52,3628.04 6715.19,3611.37 6715.19,3585.04 6705.19,3575.04 6705.19,3535.37 v1(6767.52,3473.04) ; v1@6750.14,2740.09 ccw(c6733.92,2756.31) 6756.86,2756.31 ccw(c6779.79,2756.31) v1@6763.57,2740.09 ; v1@6752.97,2737.26 ccw(c6743.58,2746.65) 6756.86,2746.65 ccw(c6770.14,2746.65) v1@6760.75,2737.26 ; v1(6756.86,2733.37) 6756.86,2772.06 7139.86,3155.06 7139.86,3449.71 7159.95,3469.8 ; v1@6758.02,3473.04 ccw(c6735.09,3473.04) 6751.31,3489.26 ccw(c6767.52,3505.48) v1@6767.52,3482.54 ; v1@6762.02,3473.04 ccw(c6748.75,3473.04) 6758.14,3482.43 ccw(c6767.52,3491.82) v1@6767.52,3478.54 ; v1@6802.02,4281.37 ccw(c6779.09,4281.37) 6795.31,4297.59 ccw(c6811.52,4313.81) v1@6811.52,4290.87 ; v1@6806.02,4281.37 ccw(c6792.75,4281.37) 6802.14,4290.76 ccw(c6811.52,4300.15) v1@6811.52,4286.87 ; v1@6955.47,4286.32 cw(c6939.26,4270.11) 6962.19,4270.11 cw(c6985.13,4270.11) v1@6968.91,4286.32 ; v1@6958.3,4289.15 cw(c6948.91,4279.76) 6962.19,4279.76 cw(c6975.47,4279.76) v1@6966.08,4289.15 ; v1(6962.19,4293.04) 6962.19,4251.37 v1(7005.19,4208.37) ; v1@6995.69,4208.37 ccw(c6972.76,4208.37) 6988.97,4224.59 ccw(c7005.19,4240.81) v1@7005.19,4217.87 ; v1@6999.69,4208.37 ccw(c6986.41,4208.37) 6995.8,4217.76 ccw(c7005.19,4227.15) v1@7005.19,4213.87 ; 7148.52,3458.37 v1(7223.52,3533.37) ; v1@7214.02,3533.37 cw(c7191.09,3533.37) 7207.31,3517.16 cw(c7223.52,3500.94) v1@7223.52,3523.87 ; v1@7218.02,3533.37 cw(c7204.75,3533.37) 7214.14,3523.99 cw(c7223.52,3514.6) v1@7223.52,3527.87 ; v2@7928.74,4395.26 cw(c7928.74,4368.7) 7947.52,4387.48 cw(c7966.3,4406.26) v2@7939.74,4406.26 ; v2@7928.74,4399.26 cw(c7928.74,4382.36) 7940.69,4394.31 cw(c7952.64,4406.26) v2@7935.74,4406.26 ; v2(7928.74,4406.26) 7948.52,4386.48 v1(7948.52,4209.71) ; v1@7941.81,4216.43 ccw(c7925.59,4232.64) 7948.52,4232.64 ccw(c7971.46,4232.64) v1@7955.24,4216.43 ; v1@7944.64,4213.6 ccw(c7935.25,4222.99) 7948.52,4222.99 ccw(c7961.8,4222.99) v1@7952.41,4213.6
  MidLayer2 w4: v1(6811.52,4281.37) 6831.19,4301.04 6890.19,4301.04 6924.52,4266.71 6952.52,4266.71 6962.19,4276.37 ; v1@6811.52,4286.87 ccw(c6811.52,4300.15) 6820.91,4290.76 ccw(c6830.3,4281.37) v1@6817.02,4281.37 ; v1@6811.52,4290.87 ccw(c6811.52,4313.81) 6827.74,4297.59 ccw(c6843.96,4281.37) v1@6821.02,4281.37 ; v1@6957.35,4284.87 cw(c6952.32,4276.38) 6962.19,4276.38 ; v1(6962.19,4293.04) 6962.19,4276.37 ; v1@6967.03,4284.87 ccw(c6972.06,4276.38) 6962.19,4276.38 ; v1(7223.52,3533.37) 7273.52,3583.37 7273.52,3875.04 7415.19,4016.71 7709.84,4016.71 7873.55,4180.42 7919.23,4180.42 v1(7948.52,4209.71) ; v1@7223.52,3538.87 ccw(c7223.52,3552.15) 7232.91,3542.76 ccw(c7242.3,3533.37) v1@7229.02,3533.37 ; v1@7223.52,3542.87 ccw(c7223.52,3565.81) 7239.74,3549.59 ccw(c7255.96,3533.37) v1@7233.02,3533.37 ; v1@7939.02,4209.71 cw(c7916.09,4209.71) 7932.31,4193.49 cw(c7948.52,4177.27) v1@7948.52,4200.21 ; v1@7943.02,4209.71 cw(c7929.75,4209.71) 7939.14,4200.32 cw(c7948.52,4190.93) v1@7948.52,4204.21
  Bottom Layer w4: v1(5790.19,2745) 5790.19,2651.33 5799.82,2641.71 6354.17,2641.71 6412.5,2700.04 6460,2700.04 6491,2731.04 6716.02,2731.04 6747.02,2700.04 6815.19,2700.04 6840.19,2725.04 6840.19,2741.71 6831.86,2750.04 6773.52,2750.04 v1(6756.86,2733.37) ; v1@6756.86,2738.87 ccw(c6756.86,2752.15) 6766.25,2742.76 ccw(c6775.64,2733.37) v1@6762.36,2733.37 ; v1@6756.86,2742.87 ccw(c6756.86,2765.81) 6773.08,2749.59 ccw(c6789.29,2733.37) v1@6766.36,2733.37 ; v1(6767.52,3473.04) 6825.52,3473.04 6866.19,3432.37 7122.52,3432.37 v1(7223.52,3533.37) ; v1@6771.41,3469.15 cw(c6780.8,3459.76) 6780.8,3473.04 cw(c6780.8,3486.32) v1@6771.41,3476.93 ; v1@6774.24,3466.32 cw(c6790.46,3450.11) 6790.46,3473.04 cw(c6790.46,3495.98) v1@6774.24,3479.76 ; v1@7003.42,4206.61 ccw(c7019.27,4222.46) 7019.27,4200.04 ; v1(7005.19,4208.37) 7013.52,4200.04 7370.52,4200.04 7394.86,4224.37 7440,4224.37 7451.19,4224.37 7535.67,4224.37 7560,4200.04 7639.19,4200.04 7648.86,4209.71 v1(7948.52,4209.71) ; v1@7006.25,4209.44 ccw(c7028.93,4232.12) 7028.93,4200.04 ; v1@7009.08,4212.26 ccw(c7038.59,4241.77) 7038.59,4200.04 ; v1@7011.91,4215.09 ccw(c7048.25,4251.43) 7048.25,4200.04 ; v1@7214.02,3533.37 cw(c7191.09,3533.37) 7207.31,3517.16 cw(c7223.52,3500.94) v1@7223.52,3523.87 ; v1@7218.02,3533.37 cw(c7204.75,3533.37) 7214.14,3523.99 cw(c7223.52,3514.6) v1@7223.52,3527.87 ; v1@7941.81,4202.99 ccw(c7925.59,4186.77) 7925.59,4209.71 ccw(c7925.59,4232.64) v1@7941.81,4216.43 ; v1@7944.64,4205.82 ccw(c7935.25,4196.43) 7935.25,4209.71 ccw(c7935.25,4222.99) v1@7944.64,4213.6
DB_MEM.BUS_A12: U7.D6 U8.AE26 U12.22 U13.22 U16.23 U17.23 U61.98 | length 7631.5
  Top Layer w4: U61.98@5645.91,2821.32 cw(c5639.08,2814.49) 5648.74,2814.49 cw(c5658.4,2814.49) U61.98@5651.57,2821.32 ; U8.AE26@5882.13,3737.24 5910,3737.24 5920,3737.24 5924.74,3737.24 ; U8.AE26@5887.32,3732.05 cw(c5899.85,3719.52) 5899.85,3737.24 cw(c5899.85,3754.97) U8.AE26@5887.32,3742.44 ; U8.AE26@5887.43,3731.94 cw(c5900.23,3719.14) 5900.23,3737.24 cw(c5900.23,3755.35) U8.AE26@5887.43,3742.55 ; 5923.52,3737.24 5931.32,3737.24 5938.19,3730.38 5938.19,3724.81 5953,3710 5953,3674.6 5944.02,3665.62 5944.02,3632.71 5929.19,3617.88 5929.19,3525.04 5941.2,3513.03 6061.51,3513.03 U13.22@6170.59,3513.03 6260.53,3513.03 6269.74,3503.82 6298.52,3475.04 6298.52,3391.71 v1(6281.86,3375.04) ; U13.22@6147.37,3507.37 ccw(c6133.72,3493.72) 6133.72,3513.03 ccw(c6133.72,3532.35) U13.22@6147.37,3518.69 ; U13.22@6193.81,3507.37 cw(c6207.46,3493.72) 6207.46,3513.03 cw(c6207.46,3532.35) U13.22@6193.81,3518.69 ; v1@6281.86,3380.54 ccw(c6281.86,3393.82) 6291.25,3384.43 ccw(c6300.64,3375.04) v1@6287.36,3375.04 ; v1@6281.86,3384.54 ccw(c6281.86,3407.48) 6298.07,3391.26 ccw(c6314.29,3375.04) v1@6291.36,3375.04 ; v1(6331.86,3143.04) 6381.86,3143.04 6398.52,3159.71 6398.52,3360 6389.19,3369.33 v1(6389.19,3408.37) ; v1@6335.75,3139.15 cw(c6345.14,3129.76) 6345.14,3143.04 cw(c6345.14,3156.32) v1@6335.75,3146.93 ; v1@6338.57,3136.32 cw(c6354.79,3120.11) 6354.79,3143.04 cw(c6354.79,3165.98) v1@6338.57,3149.76 ; v1(6348.52,2941.71) 6368.86,2941.71 ; v1@6352.74,2938.18 cw(c6360.3,2931.86) 6360.3,2941.71 cw(c6360.3,2951.55) v1@6352.74,2945.24 ; v1@6355.81,2935.61 cw(c6368.86,2924.7) 6368.86,2941.71 ; v1@6355.81,2947.8 ccw(c6368.86,2958.72) 6368.86,2941.71 ; v1@6382.47,3401.66 cw(c6366.26,3385.44) 6389.19,3385.44 cw(c6412.13,3385.44) v1@6395.91,3401.66 ; v1@6385.3,3404.49 cw(c6375.91,3395.1) 6389.19,3395.1 cw(c6402.47,3395.1) v1@6393.08,3404.49 ; U17.23@6619.41,4309.29 6651.61,4309.29 ; U17.23@6643.7,4304.97 cw(c6651.61,4299.9) 6651.61,4309.29 ; U17.23@6643.7,4313.61 ccw(c6651.61,4318.68) 6651.61,4309.29 ; v1(6665.19,4295.71) 6651.61,4309.29 ; v1(6788.52,3409.04) 6806.86,3427.37 6806.86,3504.7 6815.19,3513.03 ; v1@6788.52,3414.54 ccw(c6788.52,3427.82) 6797.91,3418.43 ccw(c6807.3,3409.04) v1@6794.02,3409.04 ; v1@6788.52,3418.54 ccw(c6788.52,3441.48) 6804.74,3425.26 ccw(c6820.96,3409.04) v1@6798.02,3409.04 ; U12.22@6820.85,3509.5 ccw(c6815.19,3506.72) 6815.19,3513.03 ; U12.22@6820.85,3516.56 cw(c6815.19,3519.34) 6815.19,3513.03 ; U12.22@6845.59,3513.03 6815.19,3513.03 ; v1(7186.19,4285.37) 7202.19,4285.37 ; v1@7194.53,4280.83 cw(c7202.19,4276.65) 7202.19,4285.37 ; v1@7194.53,4289.92 ccw(c7202.19,4294.1) 7202.19,4285.37 ; U16.23@7271.19,4303.64 ccw(c7257.54,4289.98) 7257.54,4309.29 ccw(c7257.54,4328.61) U16.23@7271.19,4314.95 ; U16.23@7294.41,4309.29 7226.11,4309.29 7202.19,4285.37 ; U61.98@5648.74,2836.46 5648.74,2786.68 5660.42,2775 5660.42,2716.12 5701,2675.55 5701,2516.63 5734.25,2483.37 5946.54,2483.37 6125.92,2662.75 6125.92,2677.44 6173.52,2725.04 6223.52,2725.04 6231.86,2733.37 6265.19,2733.37 6348.52,2816.71 6368.86,2816.71 6381.86,2829.71 6381.86,2928.71 6368.86,2941.71 ; U61.98@5648.74,2836.46 U61.98@5648.74,2837.34 U61.98@5648.74,2836.46
  Top Layer w8: U7.D6@7869.69,4419.94 cw(c7869.69,4405.46) 7879.93,4415.7 cw(c7890.17,4425.94) U7.D6@7875.69,4425.94 ; U7.D6@7869.69,4425.94 v2(7889.37,4406.26) ; v2@7880.37,4406.26 ccw(c7858.64,4406.26) 7874.01,4421.62 ccw(c7889.37,4436.99) v2@7889.37,4415.26
  MidLayer1 w4: v1(6331.86,3143.04) 6345.52,3129.37 6345.52,2944.71 v1(6348.52,2941.71) ; v1@6341.81,2948.43 ccw(c6332.83,2957.4) 6345.52,2957.4 ; 6345.52,2962.23 ccw(c6369.04,2962.23) v1@6352.41,2945.6 ; 6345.52,2971.89 ccw(c6378.7,2971.89) v1@6355.24,2948.43 ; v1(6734.86,3355.37) v1(6788.52,3409.04) 6865.19,3485.71 6865.19,3550.04 6890.19,3575.04 6915.08,3575.04 7056.74,3716.71 7066.19,3716.71 7081.86,3732.37 7081.86,4119.08 7186.19,4223.41 v1(7186.19,4285.37) ; v1@6734.86,3360.87 ccw(c6734.86,3374.15) 6744.25,3364.76 ccw(c6753.64,3355.37) v1@6740.36,3355.37 ; v1@6734.86,3364.87 ccw(c6734.86,3387.81) 6751.07,3371.59 ccw(c6767.29,3355.37) v1@6744.36,3355.37 ; v1@6779.02,3409.04 cw(c6756.09,3409.04) 6772.31,3392.82 cw(c6788.52,3376.61) v1@6788.52,3399.54 ; v1@6783.02,3409.04 cw(c6769.75,3409.04) 6779.14,3399.65 cw(c6788.52,3390.26) v1@6788.52,3403.54 ; v1@6788.52,3414.54 ccw(c6788.52,3427.82) 6797.91,3418.43 ccw(c6807.3,3409.04) v1@6794.02,3409.04 ; v1@6788.52,3418.54 ccw(c6788.52,3441.48) 6804.74,3425.26 ccw(c6820.96,3409.04) v1@6798.02,3409.04 ; v1@7179.47,4278.66 cw(c7163.26,4262.44) 7186.19,4262.44 cw(c7209.13,4262.44) v1@7192.91,4278.66 ; v1@7182.3,4281.49 cw(c7172.91,4272.1) 7186.19,4272.1 cw(c7199.47,4272.1) v1@7190.08,4281.49
  MidLayer2 w4: v1(6665.19,4295.71) 6670.86,4301.37 6782.52,4301.37 6791.86,4310.71 6973.52,4310.71 7000.86,4283.37 7138.19,4283.37 7154.86,4266.71 7167.52,4266.71 v1(7186.19,4285.37) ; v1@7176.69,4285.37 cw(c7153.76,4285.37) 7169.97,4269.16 cw(c7186.19,4252.94) v1@7186.19,4275.87 ; v1@7180.69,4285.37 cw(c7167.41,4285.37) 7176.8,4275.99 cw(c7186.19,4266.6) v1@7186.19,4279.87
  Bottom Layer w4: v1@6280.52,3376.37 6312.52,3408.37 v1(6389.19,3408.37) 6406.19,3425.37 6654.21,3425.37 6662.87,3416.71 6673.52,3416.71 v1(6734.86,3355.37) ; v1@6281.86,3384.54 ccw(c6281.86,3401.04) 6293.52,3389.37 ; v1@6287.36,3375.04 cw(c6307.07,3375.04) 6293.13,3388.98 ; v1@6291.36,3375.04 cw(c6320.73,3375.04) 6299.96,3395.81 ; v1@6382.47,3401.66 ccw(c6366.26,3385.44) 6366.26,3408.37 ccw(c6366.26,3431.31) v1@6382.47,3415.09 ; v1@6385.3,3404.49 ccw(c6375.91,3395.1) 6375.91,3408.37 ccw(c6375.91,3421.65) v1@6385.3,3412.26 ; v1@6389.19,3413.87 ccw(c6389.19,3427.15) 6398.58,3417.76 ccw(c6407.97,3408.37) v1@6394.69,3408.37 ; v1@6389.19,3417.87 ccw(c6389.19,3440.81) 6405.41,3424.59 ccw(c6421.63,3408.37) v1@6398.69,3408.37 ; v1@6725.36,3355.37 ccw(c6702.42,3355.37) 6718.64,3371.59 ccw(c6734.86,3387.81) v1@6734.86,3364.87 ; v1@6729.36,3355.37 ccw(c6716.08,3355.37) 6725.47,3364.76 ccw(c6734.86,3374.15) v1@6734.86,3360.87 ; v1@7179.47,4292.09 ccw(c7163.26,4308.31) 7186.19,4308.31 ccw(c7209.13,4308.31) v1@7192.91,4292.09 ; v1@7182.3,4289.26 ccw(c7172.91,4298.65) 7186.19,4298.65 ccw(c7199.47,4298.65) v1@7190.08,4289.26 ; v1(7186.19,4285.37) 7186.19,4308.37 7177.86,4316.71 7153.19,4316.71 7131.86,4295.37 7131.86,4258.71 7148.86,4241.71 7373.52,4241.71 7406.86,4275.04 7600.04,4275.04 7608.37,4283.37 7962.86,4283.37 7987.86,4308.37 7987.86,4336.04 7998.52,4346.71 8015.19,4346.71 8031.86,4363.37 8031.86,4370.37 8015.19,4387.04 7999.52,4387.04 7987.86,4398.71 7987.86,4416.71 7978.67,4425.89 7909,4425.89 v2(7889.37,4406.26)
DB_MEM.BUS_A13: U7.B7 U8.M26 U12.35 U13.35 U16.24 U17.24 U61.100 | length 8648.6
  Top Layer w4: v1(5600.86,2775.04) 5609.37,2783.55 U61.100@5609.37,2837.34 ; U61.100@5606.54,2821.32 cw(c5599.71,2814.49) 5609.37,2814.49 cw(c5619.03,2814.49) U61.100@5612.2,2821.32 ; U8.M26@5882.13,4249.06 5910,4249.06 5920,4249.06 5924.74,4249.06 5945,4249.05 5994.01,4200.04 6048.52,4200.04 6106.86,4258.37 6254.52,4258.37 v1(6281.52,4231.37) ; U8.M26@5887.32,4243.86 cw(c5899.85,4231.33) 5899.85,4249.06 cw(c5899.85,4266.78) U8.M26@5887.32,4254.25 ; U8.M26@5887.43,4243.75 cw(c5900.23,4230.95) 5900.23,4249.06 cw(c5900.23,4267.16) U8.M26@5887.43,4254.36 ; v1@6272.02,4231.37 ccw(c6249.09,4231.37) 6265.31,4247.59 ccw(c6281.52,4263.81) v1@6281.52,4240.87 ; v1@6276.02,4231.37 ccw(c6262.75,4231.37) 6272.14,4240.76 ccw(c6281.52,4250.15) v1@6281.52,4236.87 ; v1(6473.52,2465.04) 6500.19,2491.71 6556.86,2491.71 6573.52,2508.37 6573.52,2766.71 v1(6648.52,2841.71) ; v1@6473.52,2470.54 ccw(c6473.52,2483.82) 6482.91,2474.43 ccw(c6492.3,2465.04) v1@6479.02,2465.04 ; v1@6473.52,2474.54 ccw(c6473.52,2497.48) 6489.74,2481.26 ccw(c6505.96,2465.04) v1@6483.02,2465.04 ; v1@6566.81,4231.76 ccw(c6550.59,4247.98) 6573.52,4247.98 ccw(c6596.46,4247.98) v1@6580.24,4231.76 ; v1@6569.64,4228.93 ccw(c6560.25,4238.32) 6573.52,4238.32 ccw(c6586.8,4238.32) v1@6577.41,4228.93 ; v1(6573.52,4225.04) 6573.52,4265 6580,4271.48 6580,4335 6585.79,4340.79 ; U17.24@6595.47,4335.97 ccw(c6585.79,4328.66) 6585.79,4340.79 ; U17.24@6595.47,4345.61 cw(c6585.79,4352.91) 6585.79,4340.79 ; U13.35@6619.41,3576.02 6656.17,3576.02 ; U17.24@6619.41,4340.79 6585.79,4340.79 ; v1@6639.02,2841.71 cw(c6616.09,2841.71) 6632.31,2825.49 cw(c6648.52,2809.27) v1@6648.52,2832.21 ; U13.35@6642.65,3570.39 cw(c6656.17,3556.98) 6656.17,3576.02 ; U13.35@6642.65,3581.66 ccw(c6656.17,3595.07) 6656.17,3576.02 ; v1@6643.02,2841.71 cw(c6629.75,2841.71) 6639.14,2832.32 cw(c6648.52,2822.93) v1@6648.52,2836.21 ; v1@6680.69,3610.04 cw(c6657.76,3610.04) 6673.97,3593.82 cw(c6690.19,3577.61) v1@6690.19,3600.54 ; v1@6684.69,3610.04 cw(c6671.41,3610.04) 6680.8,3600.65 cw(c6690.19,3591.26) v1@6690.19,3604.54 ; v1(6690.19,3610.04) 6656.17,3576.02 ; v1(7125.52,3677.04) 7144.77,3696.28 7182.61,3696.28 7248.52,3630.37 7248.52,3584.02 7256.52,3576.02 U12.35@7294.41,3576.02 ; v1@7125.52,3682.54 ccw(c7125.52,3695.82) 7134.91,3686.43 ccw(c7144.3,3677.04) v1@7131.02,3677.04 ; v1@7125.52,3686.54 ccw(c7125.52,3709.48) 7141.74,3693.26 ccw(c7157.96,3677.04) v1@7135.02,3677.04 ; v1@7145.81,3892.09 ccw(c7129.59,3908.31) 7152.52,3908.31 ccw(c7175.46,3908.31) v1@7159.24,3892.09 ; v1@7148.64,3889.26 ccw(c7139.25,3898.65) 7152.52,3898.65 ccw(c7165.8,3898.65) v1@7156.41,3889.26 ; v1(7152.52,3885.37) 7152.52,3929.04 7181.86,3958.37 7181.86,4240 7191.86,4250 7370,4250 7385.19,4265.19 v1(7385.19,4291.71) 7385.19,4329.81 7374.21,4340.79 U16.24@7294.41,4340.79 ; U12.35@7271.19,3570.37 ccw(c7257.54,3556.71) 7257.54,3576.02 ccw(c7257.54,3595.34) U12.35@7271.19,3581.68 ; U16.24@7317.63,4335.13 cw(c7331.28,4321.47) 7331.28,4340.79 cw(c7331.28,4360.1) U16.24@7317.63,4346.44 ; v1@7378.47,4284.99 cw(c7362.26,4268.77) 7385.19,4268.77 cw(c7408.13,4268.77) v1@7391.91,4284.99 ; v1@7378.47,4298.43 ccw(c7362.26,4314.64) 7385.19,4314.64 ccw(c7408.13,4314.64) v1@7391.91,4298.43 ; v1@7381.3,4287.82 cw(c7371.91,4278.43) 7385.19,4278.43 cw(c7398.47,4278.43) v1@7389.08,4287.82 ; v1@7381.3,4295.6 ccw(c7371.91,4304.99) 7385.19,4304.99 ccw(c7398.47,4304.99) v1@7389.08,4295.6
  Top Layer w8: U7.B7@7948.43,4380.57 cw(c7948.43,4366.09) 7958.67,4376.33 cw(c7968.91,4386.57) U7.B7@7954.43,4386.57 ; U7.B7@7948.43,4386.57 v2(7968.11,4366.89) ; v2@7959.11,4366.89 ccw(c7937.38,4366.89) 7952.75,4382.25 ccw(c7968.11,4397.62) v2@7968.11,4375.89
  MidLayer1 w4: v1(6648.52,2841.71) 6691.19,2884.37 6715.19,2884.37 6723.52,2892.71 6723.52,2918.37 6715.19,2926.71 6715.19,3333.37 ; v1@6648.52,2847.21 ccw(c6648.52,2860.49) 6657.91,2851.1 ccw(c6667.3,2841.71) v1@6654.02,2841.71 ; v1@6648.52,2851.21 ccw(c6648.52,2874.14) 6664.74,2857.93 ccw(c6680.96,2841.71) v1@6658.02,2841.71 ; v1@6683.47,3603.32 cw(c6667.26,3587.11) 6690.19,3587.11 cw(c6713.13,3587.11) v1@6696.91,3603.32 ; v1@6686.3,3606.15 cw(c6676.91,3596.76) 6690.19,3596.76 cw(c6703.47,3596.76) v1@6694.08,3606.15 ; v1(6690.19,3610.04) 6690.19,3557 6697.19,3550 6697.19,3522.37 6731.86,3487.71 6731.86,3463.73 6707.86,3439.73 6707.86,3394.69 6715.19,3387.36 6715.19,3333.37 ; v1@7116.02,3677.04 cw(c7093.09,3677.04) 7109.31,3660.82 cw(c7125.52,3644.61) v1@7125.52,3667.54 ; v1@7120.02,3677.04 cw(c7106.75,3677.04) 7116.14,3667.65 cw(c7125.52,3658.26) v1@7125.52,3671.54 ; v1(7125.52,3677.04) 6965.19,3516.71 6965.19,3450.04 6940.19,3425.04 6873.52,3425.04 6781.86,3333.37 6715.19,3333.37
  MidLayer2 w4: v1(5600.86,2775.04) 5625.86,2800.04 5676.52,2800.04 5806.86,2669.71 5806.86,2521.52 5870,2458.37 6215.19,2458.37 6223.52,2466.71 6256.86,2466.71 v1(6298.52,2425.04) ; v1@5600.86,2780.54 ccw(c5600.86,2793.82) 5610.25,2784.43 ccw(c5619.64,2775.04) v1@5606.36,2775.04 ; v1@5600.86,2784.54 ccw(c5600.86,2807.48) 5617.07,2791.26 ccw(c5633.29,2775.04) v1@5610.36,2775.04 ; v1@6289.02,2425.04 ccw(c6266.09,2425.04) 6282.31,2441.26 ccw(c6298.52,2457.48) v1@6298.52,2434.54 ; v1@6293.02,2425.04 ccw(c6279.75,2425.04) 6289.14,2434.43 ccw(c6298.52,2443.82) v1@6298.52,2430.54 ; v1(6573.52,4225.04) 6596.54,4225.04 6605.54,4234.04 6886.86,4234.04 6895.52,4242.71 6982.86,4242.71 6998.52,4258.37 7058.19,4258.37 7073.52,4243.04 7073.52,4228.37 7085.19,4216.71 7198.52,4216.71 7281.86,4300.04 7376.86,4300.04 v1(7385.19,4291.71) ; v1@6577.41,4221.15 cw(c6586.8,4211.76) 6586.8,4225.04 cw(c6586.8,4238.32) v1@6577.41,4228.93 ; v1@6580.24,4218.32 cw(c6596.46,4202.11) 6596.46,4225.04 cw(c6596.46,4247.98) v1@6580.24,4231.76 ; 7342.14,4300.04 cw(c7342.14,4248.66) v1@7378.47,4284.99 ; 7351.79,4300.04 cw(c7351.79,4258.31) v1@7381.3,4287.82 ; 7361.45,4300.04 cw(c7361.45,4267.97) v1@7384.13,4290.65 ; 7371.11,4300.04 cw(c7371.11,4277.63) v1@7386.96,4293.48
  Bottom Layer w4: v1(6281.52,4231.37) 6300.19,4250.04 6548.52,4250.04 v1(6573.52,4225.04) ; v1@6281.52,4236.87 ccw(c6281.52,4250.15) 6290.91,4240.76 ccw(c6300.3,4231.37) v1@6287.02,4231.37 ; v1@6281.52,4240.87 ccw(c6281.52,4263.81) 6297.74,4247.59 ccw(c6313.96,4231.37) v1@6291.02,4231.37 ; v1@6298.52,2415.54 cw(c6298.52,2392.61) 6314.74,2408.82 cw(c6330.96,2425.04) v1@6308.02,2425.04 ; v1@6298.52,2419.54 cw(c6298.52,2406.26) 6307.91,2415.65 cw(c6317.3,2425.04) v1@6304.02,2425.04 ; v1(6298.52,2425.04) 6323.52,2400.04 6408.52,2400.04 v1(6473.52,2465.04) ; v1@6464.02,2465.04 cw(c6441.09,2465.04) 6457.31,2448.82 cw(c6473.52,2432.61) v1@6473.52,2455.54 ; v1@6468.02,2465.04 cw(c6454.75,2465.04) 6464.14,2455.65 cw(c6473.52,2446.26) v1@6473.52,2459.54 ; v1@6564.02,4225.04 ccw(c6541.09,4225.04) 6557.31,4241.26 ccw(c6573.52,4257.48) v1@6573.52,4234.54 ; v1@6568.02,4225.04 ccw(c6554.75,4225.04) 6564.14,4234.43 ccw(c6573.52,4243.82) v1@6573.52,4230.54 ; v1(7125.52,3677.04) 7165.19,3716.71 7165.19,3760 ; v1@7125.52,3682.54 ccw(c7125.52,3695.82) 7134.91,3686.43 ccw(c7144.3,3677.04) v1@7131.02,3677.04 ; v1@7125.52,3686.54 ccw(c7125.52,3709.48) 7141.74,3693.26 ccw(c7157.96,3677.04) v1@7135.02,3677.04 ; v1@7143.02,3885.37 cw(c7120.09,3885.37) 7136.31,3869.16 cw(c7152.52,3852.94) v1@7152.52,3875.87 ; v1@7147.02,3885.37 cw(c7133.75,3885.37) 7143.14,3875.99 cw(c7152.52,3866.6) v1@7152.52,3879.87 ; v1(7152.52,3885.37) 7123.19,3856.04 7123.19,3808.35 7165,3766.55 7165,3760 ; v1(7385.19,4291.71) 7448.52,4291.71 7473.52,4316.71 7589.52,4316.71 7614.52,4291.71 7881.86,4291.71 7909.52,4319.37 7909.52,4336.7 7920,4347.17 7948.39,4347.17 v2(7968.11,4366.89) ; v1@7389.08,4287.82 cw(c7398.47,4278.43) 7398.47,4291.71 cw(c7398.47,4304.99) v1@7389.08,4295.6 ; v1@7391.91,4284.99 cw(c7408.13,4268.77) 7408.13,4291.71 cw(c7408.13,4314.64) v1@7391.91,4298.43 ; v2@7957.11,4366.89 cw(c7930.55,4366.89) 7949.33,4348.11 cw(c7968.11,4329.33) v2@7968.11,4355.89 ; v2@7961.11,4366.89 cw(c7944.21,4366.89) 7956.16,4354.94 cw(c7968.11,4342.99) v2@7968.11,4359.89